# Altium PCB PCB_GTV3.5.PcbDoc (part 8 of 11)
Units mil, origin at the board's own origin, x right, y up, seen from the top; angles counter-clockwise.
Board outline 8070.87 x 4881.89 mil, 4 copper layers (Top Layer, GND, PWR, Bottom Layer), stack 61.653 mil thick; 490 components, 296 nets, 1533 pads, 845 vias.
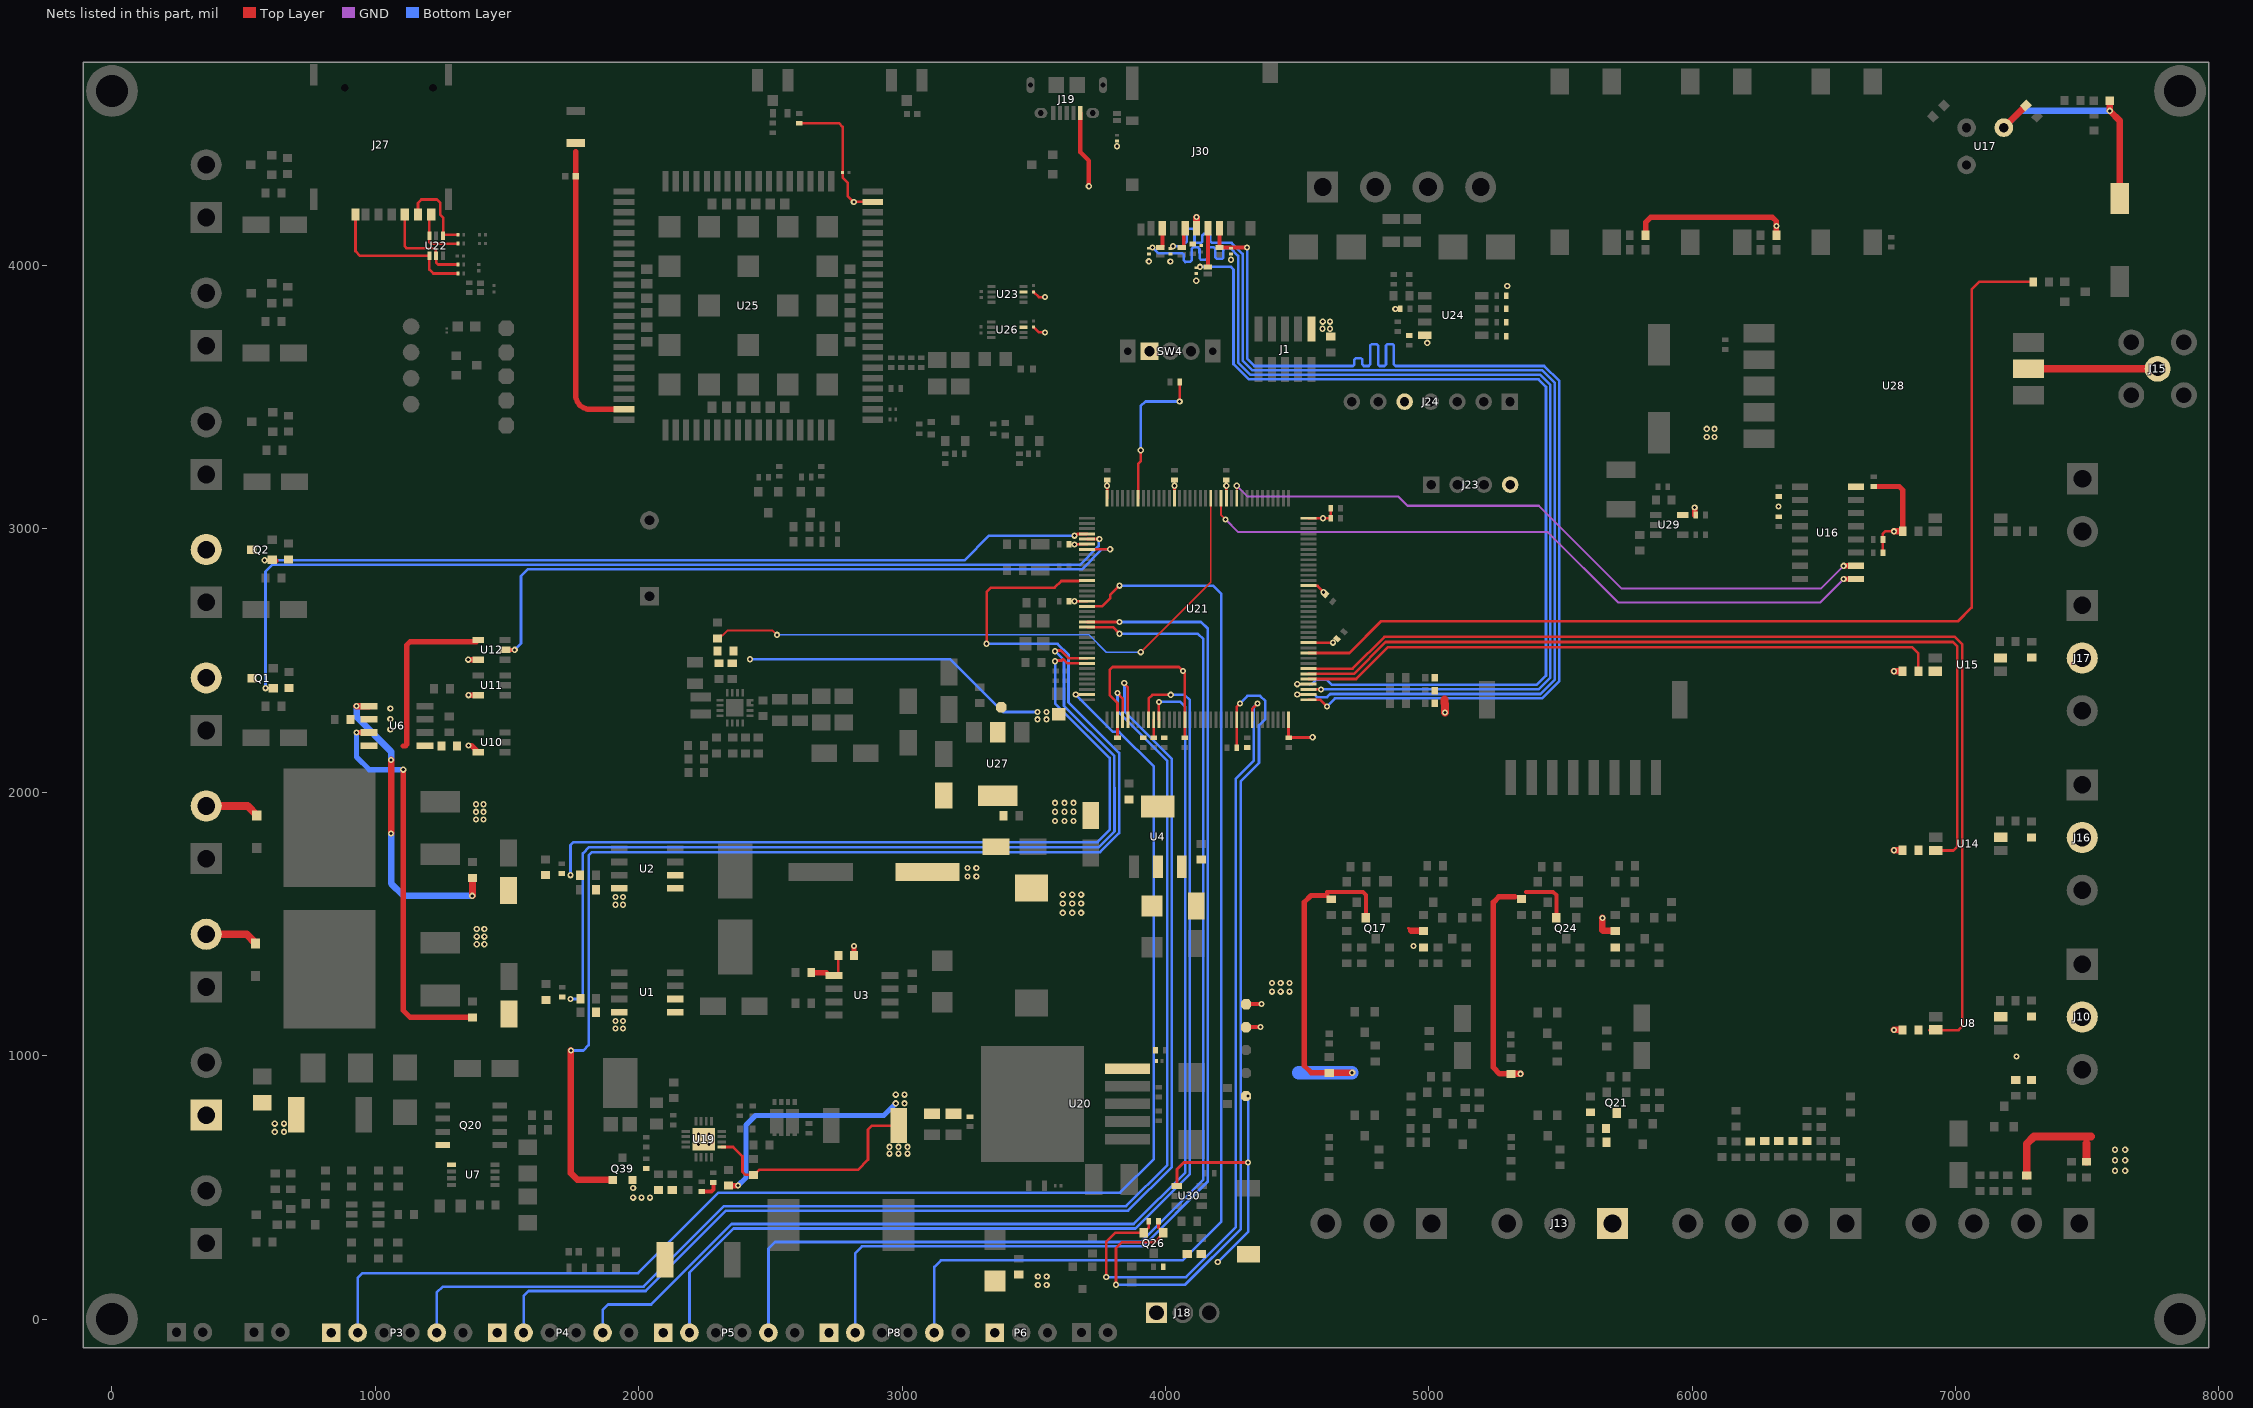
[diagram p5: the nets of this part, all layers, seen from the top]

## Part data (continued)
U27: "IC REG LINEAR 3.3V 1A SOT223", Case/Package=SOT-223, Current Rating=1A, Dropout Voltage=1.2V, LCSC Part Number=C201952, Manufacturer="Texas Instruments", Max Input Voltage=15V, Max Operating Temperature=125°C, Min Input Voltage=2.5V, Min Operating Temperature=0°C, Nominal Output Voltage=3.3V, Nominal Supply Current=5mA, Output Voltage Accuracy=1%, Package Quantity=1000, Quiescent Current=10mA, Accuracy=1%, Category="Voltage Regulators - Linear", ComponentLink11Description=LCSC, ComponentLink11URL=https://www.lcsc.com/product-detail/Linear-Voltage-Regulators-LDO_Texas-Instruments-LMS8117AMP-3-3-NOPB_C201952.html, Contact Plating=Tin,Matte, Height=1.6mm, Item Type=IC, Lead Free="Lead Free", Length=6.5mm, Manufacturer Part Number=LMS8117AMP-3.3/NOPB, Max Output Current=1A, Mount="Surface Mount", Number of Outputs=1, Number of Pins=4, Output Current=1A, Output Type=Fixed, Output Voltage=3.3V, Packaging="Tape and Reel", Polarity=Positive, Pricing 1="1=1.18760, 10=1.01800, 100=0.77540, 250=0.68460, 500=0.64870, 1000=0.59270 (USD)", Radiation Hardening=No, REACH SVHC="No SVHC", RoHS=Yes, RoHS Compliant=Yes, Stock 1=843, Supplier 1="Arrow Electronics", Supplier Part Number 1=LMS8117AMP-3.3/NOPB, Width=3.56mm
U28: "HC12 Si4463 433MHZ RF Wireless Serial Module", Manufacturer Part Number=HC-12, Package=Custom, Item Type=Module
U29: "SOT-23-5 Power Distribution Switches ROHS", LCSC Part Number=C55136, Manufacturer=Silergy, Category="USB Interface ICs", Item Type=IC, Manufacturer Part Number=SY6280AAC, RoHS=No, Stock=3000, Supplier=Avnet, Supplier Part Number=SY6280AAC
U30: "IC REG BUCK 5V 2A TSOT26", LCSC Part Number=C2071056, Manufacturer=Diodes, Supplier Part Number 1=AP63205WU-7DICT-ND, Category="Voltage Regulators - Switching", Item Type=IC, Manufacturer Part Number=AP63205WU-7, Pricing 1="1=0.88, 10=0.776, 25=0.7292, 100=0.5952, 250=0.55284, 500=0.4705, 1000=0.3764 (USD)", RoHS=Yes, Stock 1=88525, Supplier 1=Digi-Key
X1: library part XC32M4-8.000-F18LJDT, "8MHz SMD Crystal Resonator 18pF 200Ω ±20ppm ±30ppm -40℃~+85℃ SMD3225-4P Crystals ROHS", Manufacturer=HCI, ComponentLink1Description=LCSC, ComponentLink1URL=https://www.lcsc.com/product-detail/Crystals_HCI-XC32M4-8-000-F18LJDT_C2905353.html, Manufacturer Part Number=XC32M4-8.000-F18LJDT
X3: library part X321532768KGD2SI, "32.768kHz SMD Crystal Resonator 12.5pF ±20ppm -40℃~+85℃ SMD3215-2P Crystals ROHS", Manufacturer="Yangxing Tech", ComponentLink1Description=LCSC, ComponentLink1URL=https://www.lcsc.com/product-detail/Crystals_Yangxing-Tech-X321532768KGD2SI_C620155.html, Manufacturer Part Number=X321532768KGD2SI

## Free pads (board coordinates)
  round 196.85 hole 122.05: MH1(0,0) MH1(0.1,4663.13) MH1(7852.11,-0.1) MH1(7852.21,4663.03)

## Via types
v1: diameter 23.62, hole 11.81, Top Layer to Bottom Layer, tented both sides, 444 vias
v2: diameter 23.62, hole 11.81, Top Layer to Bottom Layer, 401 vias

## Nets (pads, with @x,y where several pads share a name; then routed paths per layer and width w, separated by ;. In a path a pad name is that pad's centre, name@x,y a point inside that pad or via, vN(x,y) a via of type N, cw(c..) or ccw(c..) an arc to the next point about the centre after c; other vN are vias at no path point)
0-10V: R112.1 SB36.1
2V8: C10.1 R143.1 U25.99 | length 523.7
  Top Layer w10: R143.1@2609,4540.54 2759.92,4540.54 2774.27,4526.19 C10.1@2774.27,4353.28 2774.27,4333.85 2793.26,4314.85 2793.26,4264.08 2815.61,4241.74 U25.99@2866.48,4241.74
  other v1: 2816.81,4241.74
3V3: C5.2 C23.1 C26.1 C39.1 C48.1 C49.1 C50.1 C51.1 C52.1 C76.1 C107.2 C108.2 D3.2 J1.1 J24.5 J30.4 LED8.1 LS1.1 P1.1 P3.1 P4.1 P5.1 P6.1 P8.1 Q17.2 Q24.2 R18.2 R19.2 R20.2 R23.2 R35.2 R43.2 R45.2 R48.2 R49.2 R55.2 R57.2 R58.2 R59.2 R60.2 R76.2 R79.2 R93.2 R94.2 R104.2 R105.2 R106.1 R156.2 R157.2 R158.2 R159.2 R160.2 R169.2 U4.2 U4.4 U16.16 U17.1 U24.8 | length 4779.2
  Top Layer w10: 4613.99,1621.03 4613.99,1609.92 R48.2@4629.87,1594.03 ; R94.2@4621.79,935.03 R94.2@4622.79,936.03 ; v1@4872.81,3835.32 4891.34,3835.32 R106.1@4891.53,3835.51 R106.1@4891.92,3835.13 ; 4921.87,1484.03 4931.87,1474.03 4932.93,1474.03 ; R104.2@6724,2910 6724,2982.34 6732.58,2990.92 v2(6765.87,2990.92) ; C76.1@7266.97,4607.59 C76.1@7268.19,4607.59
  Top Layer w15: P1.1@4306,1196 v1(4365,1196) ; 4613.99,1621.03 4749.29,1621.03 4761.01,1609.32 Q17.2@4761.01,1522.93 ; 5367.92,1621.8 5471.99,1621.8 5484.47,1609.32 Q24.2@5484.47,1522.93
  Top Layer w20: R48.2@4613.12,1608.57 4552.82,1608.57 4526.87,1582.61 4526.87,962.04 4553.87,935.03 R94.2@4621.79,935.03 ; R93.2@5311.87,931.03 5268.97,931.03 5244.88,955.12 5244.88,1582.33 5265.66,1603.12 5327.12,1603.12 ; R18.2@5823.87,4115.3 5823.87,4165.03 5841.87,4183.03 6304.87,4183.03 6319.27,4168.63 R19.2@6319.27,4115.3 ; C50.1@6690,3161.5 6785.92,3161.5 6799.23,3148.19 R79.2@6799.23,2990.92 ; R23.2@6798.44,2459.75 R23.2@6801.31,2459.75
  Top Layer w25: J30.4@4117.88,4141 v1@4117.88,4183.73 ; R94.2@4622.79,936.03 4623.79,935.03 v2(4708.87,935.03) ; 4932.93,1474.03 R45.2@4979.84,1474.03 ; R93.2@5311.87,931.03 v2(5347.87,931.03) ; v1(5659,1522.93) 5659.15,1522.77 5659.15,1476.53 5661.65,1474.03 R43.2@5707.87,1474.03 ; v2(6765.84,1097.92) R76.2@6798.44,1097.92 ; v2(6765.84,1779.92) R35.2@6798.44,1779.92 ; v2(6765.84,2459.75) R23.2@6798.44,2459.75 ; v2(6765.87,2990.92) R79.2@6799.23,2990.92 ; U17.1@7182.98,4523.4 7182.98,4523.74 C76.1@7266.8,4607.56 ; LED8.1@7584.51,4626.4 7585.11,4627 v1(7585.11,4587.53) 7623.87,4548.78 LS1.1@7623.87,4255
  Bottom Layer w25: U17.1@7182.98,4523.4 7247.12,4587.53 v1(7585.11,4587.53)
  Bottom Layer w50: 4505,935.03 v2(4708.87,935.03)
  other v1: 4942,1417 3581,1891 3617,1891 3651,1891 3581,1926 3617,1926 3651,1926 3581,1960 3617,1960 3651,1960 6327.95,3085 4872.81,3835.51 4117,3942.3 3936.92,4016 4018.54,4015.78 4248.31,4021.89 4117.61,4184 3816,4453
  other v2: 3515.5,129 3549,129 3515.5,162 3549,162 7231.61,996.57 4404,1243 4437.5,1243 4471,1243 4404,1276 4437.5,1276 4471,1276 4993.87,3706.56 4596.31,3760.17 4624.52,3760.17 4597,3787 4625.2,3787 5297.87,3922.03 6319.87,4150.03
3V3_MCU: C12.1 C29.1 C30.1 C31.1 C32.1 C33.1 C93.1 C95.1 C104.1 C106.1 C109.1 C110.1 C111.1 C112.1 C114.1 C124.1 C125.2 L1.1 LED1.1 LED2.1 LED3.1 P11.1 Q26.1 R31.1 R73.1 R161.2 R162.2 SW4.1 U21.6 U21.17 U21.39 U21.52 U21.62 U21.72 U21.84 U21.95 U21.108 U21.121 U21.131 U21.144 U23.7 U26.7 U27.2 U27.4 | length 6120.7
  Top Layer w10: C106.1@3499,3766.19 3519,3746.19 v1(3542.99,3746.19) ; C104.1@3499,3900.19 3519,3880.19 v1(3542.99,3880.19) ; v1(3655.01,2725.56) U21.17@3702.4,2725.56 ; v1(3655.04,2940.73) 3656.41,2942.1 U21.6@3702.4,2942.1 U21.6@3701.88,2941.59 ; U21.144@3778.38,3116.51 v1(3778.38,3163.89) ; v2(3812.03,130.32) 3812.03,269.84 3833.72,291.53 3957.92,291.53 3992.4,326.02 3992.4,329.96 3982.26,340.1 3980.53,340.1 3973.5,347.13 R73.1@3973.5,371.33 ; C30.1@3817.75,2207.5 U21.39@3817.75,2275.56 3817.75,2338.9 3788.03,2368.62 3788.03,2464.64 3799.39,2476 4051.42,2476 v1(4066.49,2460.93) 4066.49,2457.24 4073.66,2450.08 C29.1@4073.66,2207.5 ; U21.131@4034.28,3116.51 v1(4034.28,3163.89) ; U21.121@4231.14,3116.51 v1(4231.14,3163.89) ; C12.1@4270.51,2169.01 U21.62@4270.51,2275.56 4270.51,2324.7 4283.01,2337.2 v1(4283.01,2337.37) ; U21.72@4467.36,2275.56 C31.1@4467.36,2207.5 4468.11,2208.25 4558.25,2208.25 v1(4559,2209) ; U21.84@4543.34,2568.08 v1(4636.26,2568.08) v1@4637.31,2568.08 ; U21.95@4543.34,2784.62 4543.85,2784.11 4577.36,2784.11 4600.51,2760.95 v1(4600.51,2759.42) ; U21.108@4543.34,3040.52 v1(4598,3040.52) C93.1@4627.5,3040.52 C112.1@4627.5,3079 ; C32.1@4650.42,2581.2 C32.1@4651.47,2581.2
  Top Layer w30: 5059.27,2352.21 5059.27,2338.03 5061.87,2335.44 v2(5061.87,2303.03)
  Bottom Layer w10: v2(2422.41,2505) 3183,2505 3383,2305 v2(3514.5,2305) ; v2(3812.03,130.32) 4074.39,130.32 4286.06,341.99 4286.06,2042.11 4355.31,2111.37 4355.31,2254.41 4378.98,2278.07 4378.98,2345.79 4358.76,2366.01 4311.64,2366.01 v1(4283.01,2337.37)
  other v2: 3514.5,2277 3548,2277 3548,2305
4-20mA: R103.1 R110.1 SB35.1
5V: C4.1 C6.1 C16.1 C17.1 C18.1 C21.1 C22.1 C55.1 C71.2 D2.1 D28.2 J19.1 J23.4 L2.2 P7.1 R1.1 R21.2 R85.2 SB43.1 U1.8 U2.8 U4.3 U6.6 U10.5 U11.5 U12.5 U29.5 | length 980.4
  Top Layer w10: R21.2@7269.98,545.4 R21.2@7270.34,545.03
  Top Layer w15: P7.1@4305.75,1108.68 v1(4360.75,1108.68)
  Top Layer w16: J19.1@3676.57,4579.07 3676.57,4430.48 3709,4398.05 v2(3709,4301)
  Top Layer w20: v2(1352.87,2503.66) U12.5@1390.1,2503.66 ; v2(1353.28,2178.04) 1364.51,2178.04 U10.5@1390.1,2152.45 ; v2(1353.28,2368.81) U11.5@1390.51,2368.81 ; R1.1@2817.87,1380.03 v1(2817.87,1416.67) ; C71.2@6009.31,3050.97 v1(6009.31,3081.43)
  Top Layer w30: R21.2@7269.98,545.4 7269.98,665.27 7298.06,693.35 7514,693.35 ; SB43.1@7496.98,597.4 7496.98,666.28
  other v1: 7605,563 7643.87,563 7605,603 7643.87,603 7605,643 7643.87,643 3610.05,1542.35 3646.05,1542.35 3680.05,1542.35 3610.05,1577.35 3646.05,1577.35 3680.05,1577.35 3610.05,1611.35 3646.05,1611.35 3680.05,1611.35 1057,2238 1057,2278 1057,2318
  other v2: 1912,1103.07 1940.83,1103.07 1912,1132 1940.83,1132 1912,1573.07 1940.83,1573.07 1912,1602 1940.83,1602 3248.5,1680 3282,1680 3248.5,1713 3282,1713 6055,3348.8 6085,3348.8 6055,3380 6085,3380
5V-LED: C128.2 C129.2 J18.1 L3.2 P16.1 R74.1 U30.1 | length 1024.9
  Top Layer w12: U30.1@4043.26,504.74 4043.26,567.9 4069.64,594.27 v2(4313.75,594.27) v2@4315.75,594.27
  Bottom Layer w10: v2(4198.66,216.29) 4313.75,331.38 v2(4313.75,594.27) 4313.75,846.84 v2(4313.84,846.92)
#SIM_CD: J27.CD R152.1 U22.4 | length 594.5
  Top Layer w10: J27.CD@924.53,4193.9 924.53,4054.37 942.06,4036.85 U22.4@1205.28,4036.85 1205.28,3984.7 1219.95,3970.03 R152.1@1314.03,3970.03
#SIM_CLK: J27.C3 R151.1 U22.3 | length 215.2
  Top Layer w7: U22.3@1205.22,4113.17 U22.3@1205.28,4113.22
  Top Layer w10: J27.C3@1204.06,4181.03 1204.06,4114.44 U22.3@1205.28,4113.22 ; J27.C3@1204.06,4186.03 J27.C3@1211.93,4193.9 ; U22.3@1205.22,4113.17 1205.22,4088.33 1210.15,4083.41 R151.1@1314.03,4083.41
#SIM_DATA: J27.C7 R153.1 U22.1 | length 324.5
  Top Layer w7: U22.1@1257.85,4114.61 U22.1@1260.36,4117.12
  Top Layer w10: J27.C7@1161.93,4193.9 1161.93,4237.67 1174.87,4250.61 1234.29,4250.61 1245.94,4238.96 1245.94,4193.95 1257.85,4182.05 U22.1@1257.85,4114.61 ; U22.1@1260.36,4117.12 R153.1@1314.03,4117.12
#SIM_RST: J27.C2 R150.1 U22.5 | length 374.7
  Top Layer w10: J27.C2@1111.93,4188.9 1111.93,4072.65 1118.59,4065.99 1223.46,4065.99 1229.32,4060.14 1229.32,4038.39 U22.5@1230.87,4036.85 1230.87,4011.03 1238.15,4003.75 R150.1@1314.03,4003.75
_ADC: C36.1 R12.1 R13.1 U21.46 | length 68.1
  Top Layer w10: R13.1@3955.54,2207.5 U21.46@3955.54,2275.56
A: U16.10 U21.119 | length 2595.9
  Top Layer w7: U21.119@4270.51,3116.51 v2(4270.51,3163.89)
  Top Layer w20: v1(6575,2860) U16.10@6621.3,2860
  GND w8: v2(4270.51,3163.89) 4310.58,3123.82 4883.11,3123.82 4918.97,3087.95 5417.96,3087.95 5732.66,2773.26 6488.26,2773.26 v1(6575,2860)
ADC_14: P4.2 U21.41 | length 4860
  Top Layer w10: v1(3843.64,2415.05) 3843.64,2411.36 3857.12,2397.89 U21.41@3857.12,2275.56
  Bottom Layer w10: P4.2@1562.87,-51.43 1562.87,87.03 1582.18,106.35 2026.06,106.35 2331.57,411.86 3857.97,411.86 4024.22,578.11 4024.22,2126.52 3844.49,2306.25 3844.49,2414.2 v1(3843.64,2415.05)
ADC_15: P4.5 U21.47 | length 4457.9
  Top Layer w10: v1(3975.11,2343.38) v1(3975.11,2343.38) 3975.17,2275.62 U21.47@3975.23,2275.56
  Bottom Layer w10: P4.5@1862.87,-51.43 1862.87,34.04 1884.18,55.35 2047.18,55.35 2352.69,360.86 3879.09,360.86 4075.22,556.98 4075.22,2324.83 4056.67,2343.38 v1(3975.11,2343.38)
Addr-LED: Q26.2 R73.2 U21.65 | length 3006.1
  Top Layer w10: v2(3775.16,159.32) 3775.16,293.06 3810.08,327.99 Q26.2@3917.6,327.99 3917.6,329.96 3927.74,340.1 3929.47,340.1 3936.5,347.13 R73.2@3936.5,371.33 ; U21.65@4329.56,2275.56 4329.56,2317.69 v1(4349.25,2337.37)
  Bottom Layer w10: v2(3775.16,159.32) 4078.02,159.32 4266.72,348.02 4266.72,2051.43 4335.89,2120.6 4335.89,2324.02 v1(4349.25,2337.37)
ADJ: R130.1 R133.2 U20.5
AGND: C86.1 Q39.2 R124.2 R125.1 R129.1 R148.1 R168.1 U19.17 | length 74.4
  Top Layer w15: C86.1@2238.63,484.67 2276.68,484.67 2283.66,491.65 R129.1@2283.66,518.17
  other v2: 1979,461.03 2010.96,461.03 2042.92,461.03 1979,498.02
AN1: P8.2 U21.21 | length 4320.4
  Top Layer w10: U21.21@3702.4,2646.82 v1(3826,2646.82)
  Bottom Layer w10: P8.2@2822.37,-51.43 2822.37,250.4 2847.83,275.86 3914.3,275.86 4160.57,522.13 4160.57,2621.11 4134.86,2646.82 v1(3826,2646.82)
AN2: P8.5 U21.18 | length 4355.2
  Top Layer w10: U21.18@3702.4,2705.88 3759.39,2705.88 3789.98,2736.47 3789.98,2748.6 v1(3826,2784.62)
  Bottom Layer w10: P8.5@3122.37,-51.43 3122.37,197.7 3147.65,222.98 4064.8,222.98 4212.22,370.39 4212.22,2752.09 4179.69,2784.62 v1(3826,2784.62)
AN10: P3.2 U21.35 | length 5359.7
  Top Layer w10: v1(3659.32,2371.23) U21.35@3702.4,2371.23
  Bottom Layer w10: P3.2@933.12,-51.43 933.12,155.29 952.18,174.35 1997.89,174.35 2303.4,479.86 3827.53,479.86 3956.22,608.55 3956.22,2097.14 3823.8,2229.56 3800.99,2229.56 v1(3659.32,2371.23)
AN11: P3.5 U21.40 | length 5106.4
  Top Layer w10: v1(3817.68,2376.89) v1(3817.68,2376.89) 3837.43,2357.06 U21.40@3837.43,2275.56
  Bottom Layer w10: P3.5@1233.12,-51.43 1233.12,100.29 1256.18,123.35 2019.01,123.35 2324.53,428.86 3850.93,428.86 4007.22,585.15 4007.22,2119.48 3817.79,2308.91 3817.79,2376.78 v1(3817.68,2376.89)
AN12: P5.2 U21.45 | length 4333.7
  Top Layer w10: U21.45@3935.86,2275.56 3935.86,2355.83 3950.22,2370.19 v1(4020.11,2370.19)
  Bottom Layer w10: P5.2@2192.62,-51.43 2192.62,176.74 2359.74,343.86 3886.14,343.86 4092.57,550.3 4092.57,2349.81 4072.19,2370.19 v1(4020.11,2370.19)
AN13: P5.5 U21.22 | length 4590.5
  Top Layer w10: U21.22@3702.4,2627.14 3800.8,2627.14 3825.92,2602.02 v1(3826,2602.02)
  Bottom Layer w10: P5.5@2492.62,-51.43 2492.62,267.21 2518.27,292.86 3907.26,292.86 4143.57,529.17 4143.57,2581.47 4123.11,2601.94 3826.08,2601.94 v1(3826,2602.02)
ANT: J15.1 U28.6 | length 490.2
  Top Layer w30: U28.6@7276.8,3608.05 J15.1@7767,3608.05
AUTO_FILL: J5.2 Q1.3
AUTO_FLUSH: J6.2 Q2.3
AUX_HEATER: C60.2 J13.1 Q21.3 R67.1 SB8.2
B: U16.9 U21.122 | length 2648.7
  Top Layer w7: U21.122@4211.45,3116.51 4211.45,3052.72 v2(4228.43,3035.73)
  Top Layer w20: v1(6575,2810) U16.9@6621.3,2810
  GND w8: v2(4228.43,3035.73) 4276.14,2988.03 5452.09,2988.03 5720.12,2720 6485,2720 v1(6575,2810)
BACKUP: C123.2 R162.1 R163.2 U21.124 | length 2347.8
  Top Layer w7: C123.2@2299.33,2584 2310.83,2595.5 2318.46,2595.5 2336.96,2614 2509,2614 v2(2525,2598) ; v2(3906,2532) 4172.08,2798.08 U21.124@4172.08,3116.51
  Bottom Layer w7: v2(2525,2598) 3709.68,2598 3775.68,2532 v2(3906,2532)
BAT: C2.2 C83.2 C84.2 C85.2 C87.2 J2.1 R120.1 R127.2 R149.2 U19.9 | length 1776
  Top Layer w10: U19.9@2315.54,653.3 2358.77,653.3 2394.04,618.03 2394.04,558.5 2405.03,547.51 C87.2@2435.8,547.51 2438.3,547.51 2457.46,566.67 2832,566.67 2870.56,605.23 2870.56,719.75 2885.49,734.67 R120.1@2986.7,734.67
  Top Layer w20: R127.2@2340.75,506.67 v2(2377.25,506.67)
  Bottom Layer w20: v2(2377.25,506.67) 2407,536.43 2407,736.24 2444.12,773.35 2930.19,773.35 v2(2975.87,819.03)
  other v2: 2952.7,628 2986.7,628 3020.7,628 2952.7,654 2986.7,654 3020.7,654 618.07,710.81 653.07,710.81 618.07,741.81 653.07,741.81 3009.37,819.03 2975.87,852.03 3009.37,852.03
BOOT0: R16.1 U21.138 | length 583.1
  Top Layer w10: U21.138@3896.49,3116.51 3896.49,3247.33 3906,3256.84 v1(3906,3298.72) ; v1(4054,3484) 4054.25,3484.25 4054.25,3557.75 R16.1@4054.5,3558
  Bottom Layer w10: v1(3906,3298.72) 3906,3466 3924,3484 v1(4054,3484)
BT_ANT: ANT1.1 D13.2 U25.93 | length 1138.8
  Top Layer w20: 1760.87,4433.03 1760.87,4341 1760.87,3507.57 ccw(c1814.1,3507.57) 1762.9,3493 ccw(c1814.1,3507.57) 1799.54,3456.36 ccw(c1814.1,3507.57) 1814.1,3454.33 U25.93@1943.82,3454.33
BUZZER: R62.2 U21.82 | length 4042.4
  Top Layer w10: U21.82@4543.34,2528.71 4697.87,2528.71 4818.66,2649.5 4912.36,2649.5 7008.61,2649.5 7060.87,2701.76 7060.87,3909.16 7089.76,3938.05 R62.2@7294.67,3938.05
CE: Q39.1 U21.13 | length 5160.6
  Top Layer w10: v2(3320.99,2564) 3320.99,2759.67 3338.19,2776.87 3579.58,2776.87 3604.84,2802.13 3671.07,2802.13 3672.73,2803.79 3701.88,2803.79 U21.13@3702.4,2804.3
  Top Layer w25: v2(1742.76,1019.92) 1742.76,553.68 1767.56,528.88 Q39.1@1900.5,528.88
  Bottom Layer w10: v2(1742.76,1019.92) 1789.92,1019.92 1809.86,1039.86 1809.86,1760.74 1822.13,1773 3751.98,1773 3824.3,1845.32 3824.3,2127.83 3824.13,2128 3824.13,2149.03 3632,2341.16 3632,2522.62 3590.62,2564 v2(3320.99,2564)
CII: R1.2 R2.2 U3.5 | length 178.7
  Top Layer w10: U3.5@2741.39,1304.3 2750.07,1304.3 2757.87,1312.1 R1.2@2757.87,1380.03
  Top Layer w20: R2.2@2654.98,1315.4 2711.59,1315.4 2722.69,1304.3 U3.5@2741.39,1304.3
CLK: D22.2 J30.5 R158.1 U21.74 | length 4312.5
  Top Layer w10: v1(4500.26,2371.23) U21.74@4543.34,2371.23
  Top Layer w15: D22.2@4061.46,4068.95 D22.2@4061.84,4068.56 D22.2@4069.37,4076.09 ; 4069.37,4080.09 J30.5@4069.37,4140.25 ; J30.5@4074.37,4140.25 J30.5@4074.84,4140.73
  Bottom Layer w10: v1(4028.54,4073.41) 4028.71,4073.24 4063.2,4073.24 4069.33,4079.37 4080.33,4090.37 4080.33,4133.48 4086.33,4139.48 4104.33,4139.48 4110.33,4133.48 4110.33,4092.03 4116.33,4086.03 4134.33,4086.03 4140.33,4092.03 4140.33,4114.53 4146.33,4120.53 4164.33,4120.53 4170.33,4114.53 4170.33,4092.03 4176.33,4086.03 4185.76,4086.03 4250.99,4086.03 4292.85,4044.18 4292.85,3639.58 4330.61,3601.81 5430.7,3601.81 5478.6,3553.91 5478.6,2428.76 5423.35,2373.51 4625.67,2373.51 4613.18,2361.02 4575.41,2361.02 4565.2,2371.23 v1(4500.26,2371.23)
CMD: D21.2 J30.3 R157.1 U21.76 | length 4312.5
  Top Layer w10: v1(4500.26,2410.6) U21.76@4543.34,2410.6
  Top Layer w15: D21.2@4160.65,3995.28 D21.2@4160.84,3995.08 ; J30.3@4161.46,4140.73 4161.65,4140.53 D21.2@4161.65,3999.28
  Bottom Layer w10: v1@4131.84,3994.79 4248.71,3994.79 4258.38,3985.13 4258.38,3625.96 4316.53,3567.81 5416.61,3567.81 5444.6,3539.82 5444.6,3114.79 5444.6,2442.84 ; v1(4500.26,2410.6) 4555.7,2410.6 4571.92,2426.83 4612.99,2426.83 4632.1,2407.72 5409.47,2407.72 5444.6,2442.84 ; 5444.6,2788.33 5444.6,2442.84
  other v1: 4131.55,3995.08
CRNT_SNS.IP+_1: D25.2 J3.2 U1.1 U1.2 | length 202
  Top Layer w30: J3.2@357.92,1461.02 511.35,1461.02 544.98,1427.39 D25.2@544.98,1426.4
  other v2: 1385,1423 1413.83,1423 1385,1451.93 1413.83,1451.93 1385,1480.86 1413.83,1480.86
CRNT_SNS.IP+_2: D26.2 J4.2 U2.1 U2.2 | length 207.4
  Top Layer w30: J4.2@357.92,1948.07 515.3,1948.07 549.98,1913.39 D26.2@549.98,1912.4
  other v2: 1382,1897 1410.83,1897 1382,1925.93 1410.83,1925.93 1382,1954.86 1410.83,1954.86
CRNT_VOUT.VIOUT1: C11.1 R5.2 R7.1 U21.28 | length 3556.6
  Top Layer w10: v1(3581.06,2535.65) 3583.66,2538.26 3600.04,2538.26 3601.4,2539.62 3632,2509.03 U21.28@3702.4,2509.03
  Bottom Layer w10: v2(1740.87,1215.03) 1771.19,1215.03 1787.86,1231.7 1787.86,1768.26 1811.6,1792 3746.94,1792 3806.3,1851.36 3806.3,2017.63 3806.13,2017.8 3806.13,2136.95 3615,2328.08 3615,2501.71 v1(3581.06,2535.65)
CRNT_VOUT.VIOUT2: C19.1 R8.2 R10.1 U21.29 | length 3042.8
  Top Layer w10: v1(3581.06,2497.73) 3583.66,2500.34 3605.64,2500.34 3610.98,2505.68 3627.31,2489.34 U21.29@3702.4,2489.34
  Bottom Layer w10: v2(1740.87,1685.51) 1740.87,1799.11 1752.76,1811 3741.9,1811 3788.3,1857.4 3788.3,2010.18 3788.13,2010.34 3788.13,2130.91 3581.06,2337.99 v1(3581.06,2497.73)
DAT0: D23.2 J30.7 R159.1 U21.75 | length 4312.4
  Top Layer w10: U21.75@4543.34,2390.92 v1@4590.28,2390.92
  Top Layer w15: D23.2@3979.92,4068.86 D23.2@3980,4068.78 ; J30.7@3988.23,4140.73 3988.31,4140.65 D23.2@3988.31,4072.78
  Bottom Layer w10: v1(3950.7,4068.78) 3972.89,4046.59 4028.55,4046.59 4029.64,4046.59 4029.81,4046.43 4045.12,4046.43 4045.28,4046.59 4063.03,4046.59 4063.54,4047.11 4069.59,4041.16 4069.76,4019.68 4075.81,4013.72 4093.81,4013.87 4099.76,4019.92 4099.42,4062.79 4105.37,4068.84 4123.37,4068.99 4129.42,4063.03 4129.7,4027.89 4135.75,4021.94 4153.75,4022.09 4159.7,4028.14 4159.42,4062.79 4165.37,4068.84 4183.37,4068.99 4189.42,4063.03 4189.68,4031.16 4195.72,4025.21 4213.72,4025.35 4219.68,4031.4 4219.45,4059.76 4225.4,4065.81 4237.55,4065.81 4246.81,4065.81 4275.85,4036.77 4275.85,3632.53 4323.57,3584.81 5423.65,3584.81 5461.6,3546.86 5461.6,2435.8 5416.51,2390.72 v1(4590.48,2390.72)
DAT3: D20.2 J30.2 R156.1 U21.73 | length 4312.4
  Top Layer w10: U21.73@4543.34,2351.55 4587.45,2351.55 v1(4613,2326)
  Top Layer w15: J30.2@4204.77,4140.73 4204.96,4140.53 D20.2@4204.96,4072.82 ; D20.2@4204.81,4068.97 4204.96,4068.82 D20.2@4205,4068.78 ; D20.2@4204.96,4068.78 4205.35,4068.39 4248.31,4068.39 4248.92,4069 v1(4310,4069)
  Bottom Layer w10: v1@4310,4073 4310,3646.46 4337.65,3618.81 4676.37,3618.81 4711.27,3618.81 4717.27,3624.81 4717.27,3642.44 4723.27,3648.44 4741.27,3648.44 4747.27,3642.44 4747.27,3624.81 4753.27,3618.81 4771.27,3618.81 4777.27,3624.81 4777.27,3695.89 4783.27,3701.89 4801.27,3701.89 4807.27,3695.89 4807.27,3624.81 4813.27,3618.81 4831.27,3618.81 4837.27,3624.81 4837.27,3695.89 4843.27,3701.89 4861.27,3701.89 4867.27,3695.89 4867.27,3624.81 4873.27,3618.81 4908.28,3618.81 5437.74,3618.81 5495.6,3560.95 5495.6,2421.72 5430.39,2356.51 4643.51,2356.51 v1(4613,2326)
DRV_OUTA1: R24.2 U6.7 | length 1525
  Top Layer w20: v2(928.47,2227.21) U6.7@976.09,2227.21 ; v2(1106,2086) 1106,1172.24 1132.6,1145.64 R24.2@1368.26,1145.64
  Bottom Layer w20: v2(928.47,2227.21) 928.47,2134.53 977,2086 v2(1106,2086)
DRV_OUTB1: R25.2 U6.5 | length 1172
  Top Layer w20: U6.5@976.09,2327.21 U6.5@976.69,2327.81
  Top Layer w25: v2(928.47,2327.21) U6.5@976.09,2327.21 ; v2(1060,1844) v2(1060,2123) ; v2(1368,1607) 1368.87,1607.87 R25.2@1368.87,1675
  Bottom Layer w20: v2(928.47,2327.21) v2@929.17,2326.51
  Bottom Layer w25: v2@929.17,2326.51 929.17,2285.53 1060,2154.7 v2(1060,2123) ; v2(1060,1844) 1060,1654.04 1107.04,1607 v2(1368,1607)
ENA: U12.2 U21.7 | length 2693.6
  Top Layer w10: U21.7@3702.4,2922.41 3702.69,2922.71 3789.71,2922.71 v1(3790,2923)
  Top Layer w15: U12.2@1492.46,2541.06 v2(1529.06,2541.06)
  Bottom Layer w10: v2(1529.06,2541.06) 1553.15,2565.16 1553.15,2821.25 1578.35,2846.44 3682.95,2846.44 3759.51,2923 v1(3790,2923)
ENA#: R85.1 U6.1 U6.8 U12.4 | length 663.6
  Top Layer w20: 1105.2,2176.21 1114.12,2176.21 1119.12,2181.21 1119.12,2558.78 1132.37,2572.03 U12.4@1383.67,2572.03
FILL_CNTRL: Q1.1 R69.1 U21.5 | length 3720.6
  Top Layer w10: U21.5@3702.4,2961.78 v1(3749,2961.78)
  Bottom Layer w10: v1(583,2395.44) 583,2837.94 608.5,2863.44 3674.9,2863.44 3746.43,2934.97 3746.43,2959.22 v1(3749,2961.78)
FLOW_MCU1: R76.1 U8.4 U21.79 | length 4126.7
  Top Layer w10: U21.79@4543.34,2469.66 4710.94,2469.66 4831.73,2590.44 4837.36,2590.44 6996.81,2590.44 7025.87,2561.39 7025.87,1111.8 7011.1,1097.03 6924.21,1097.03 U8.4@6899.51,1097.03
FLOW_MCU2: R35.1 U14.4 U21.78 | length 3343.4
  Top Layer w10: U21.78@4543.34,2449.97 4715.29,2449.97 4836.08,2570.76 4882.36,2570.76 6989.63,2570.76 7006.87,2553.52 7006.87,1794.23 6991.56,1778.92 6949.8,1778.92
FLOW_MCU3: R23.1 U15.4 U21.77 | length 2442.8
  Top Layer w10: U21.77@4543.34,2430.29 4723.82,2430.29 4844.61,2551.07 6834.84,2551.07 6858.44,2527.47 R23.1@6858.44,2459.75 ; U15.4@6922.43,2459.75 U15.4@6922.54,2459.86
FLOW_OUT1: J10.2 R77.1 U8.2
FLOW_OUT2: J16.2 R36.1 U14.2
FLOW_OUT3: J17.2 R38.1 U15.2
FLUSH_CNTRL: Q2.1 R70.1 U21.4 | length 3167.3
  Top Layer w10: v1(3654.25,2974.34) 3657.93,2974.34 3664.55,2980.96 3701.88,2980.96 U21.4@3702.4,2981.47
  Top Layer w20: Q2.1@619.75,2880.83 619.83,2880.91 Q2.1@622.01,2878.73
  Bottom Layer w10: v1(579.94,2881) 3236.53,2881 3329.87,2974.34 v1(3654.25,2974.34)
GATE: Q20.4 U7.1